# EAGLE board pid2_levitador_esquinas45 (EAGLE 9.7.0)
Placa de controladores PID analógicos con etapa de potencia, una cara (cobre inferior) con puentes de alambre
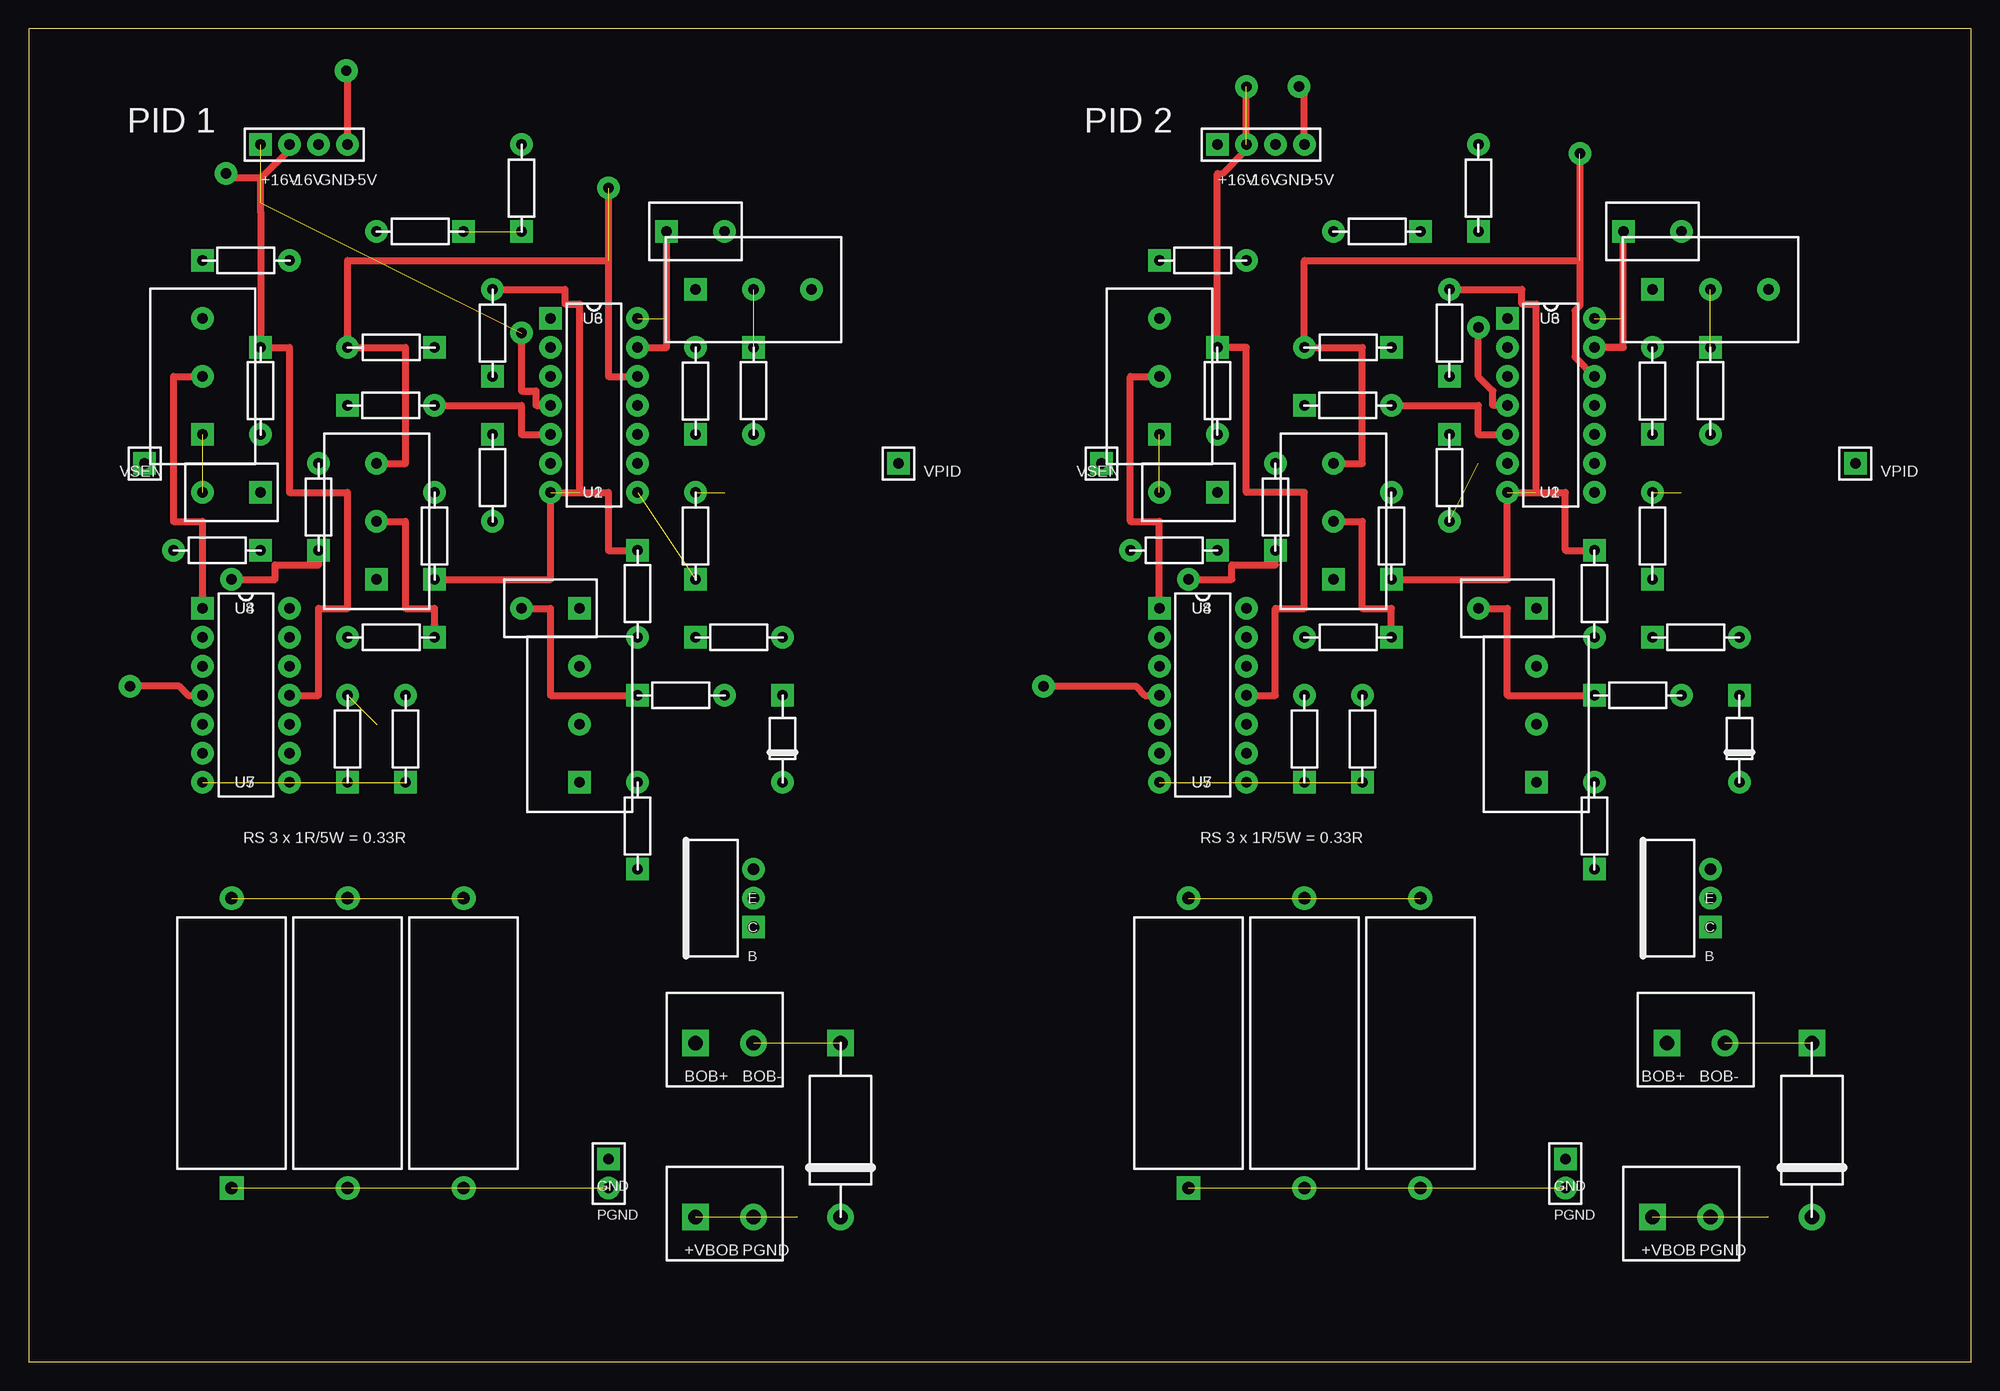
[diagram p0: board, top side]
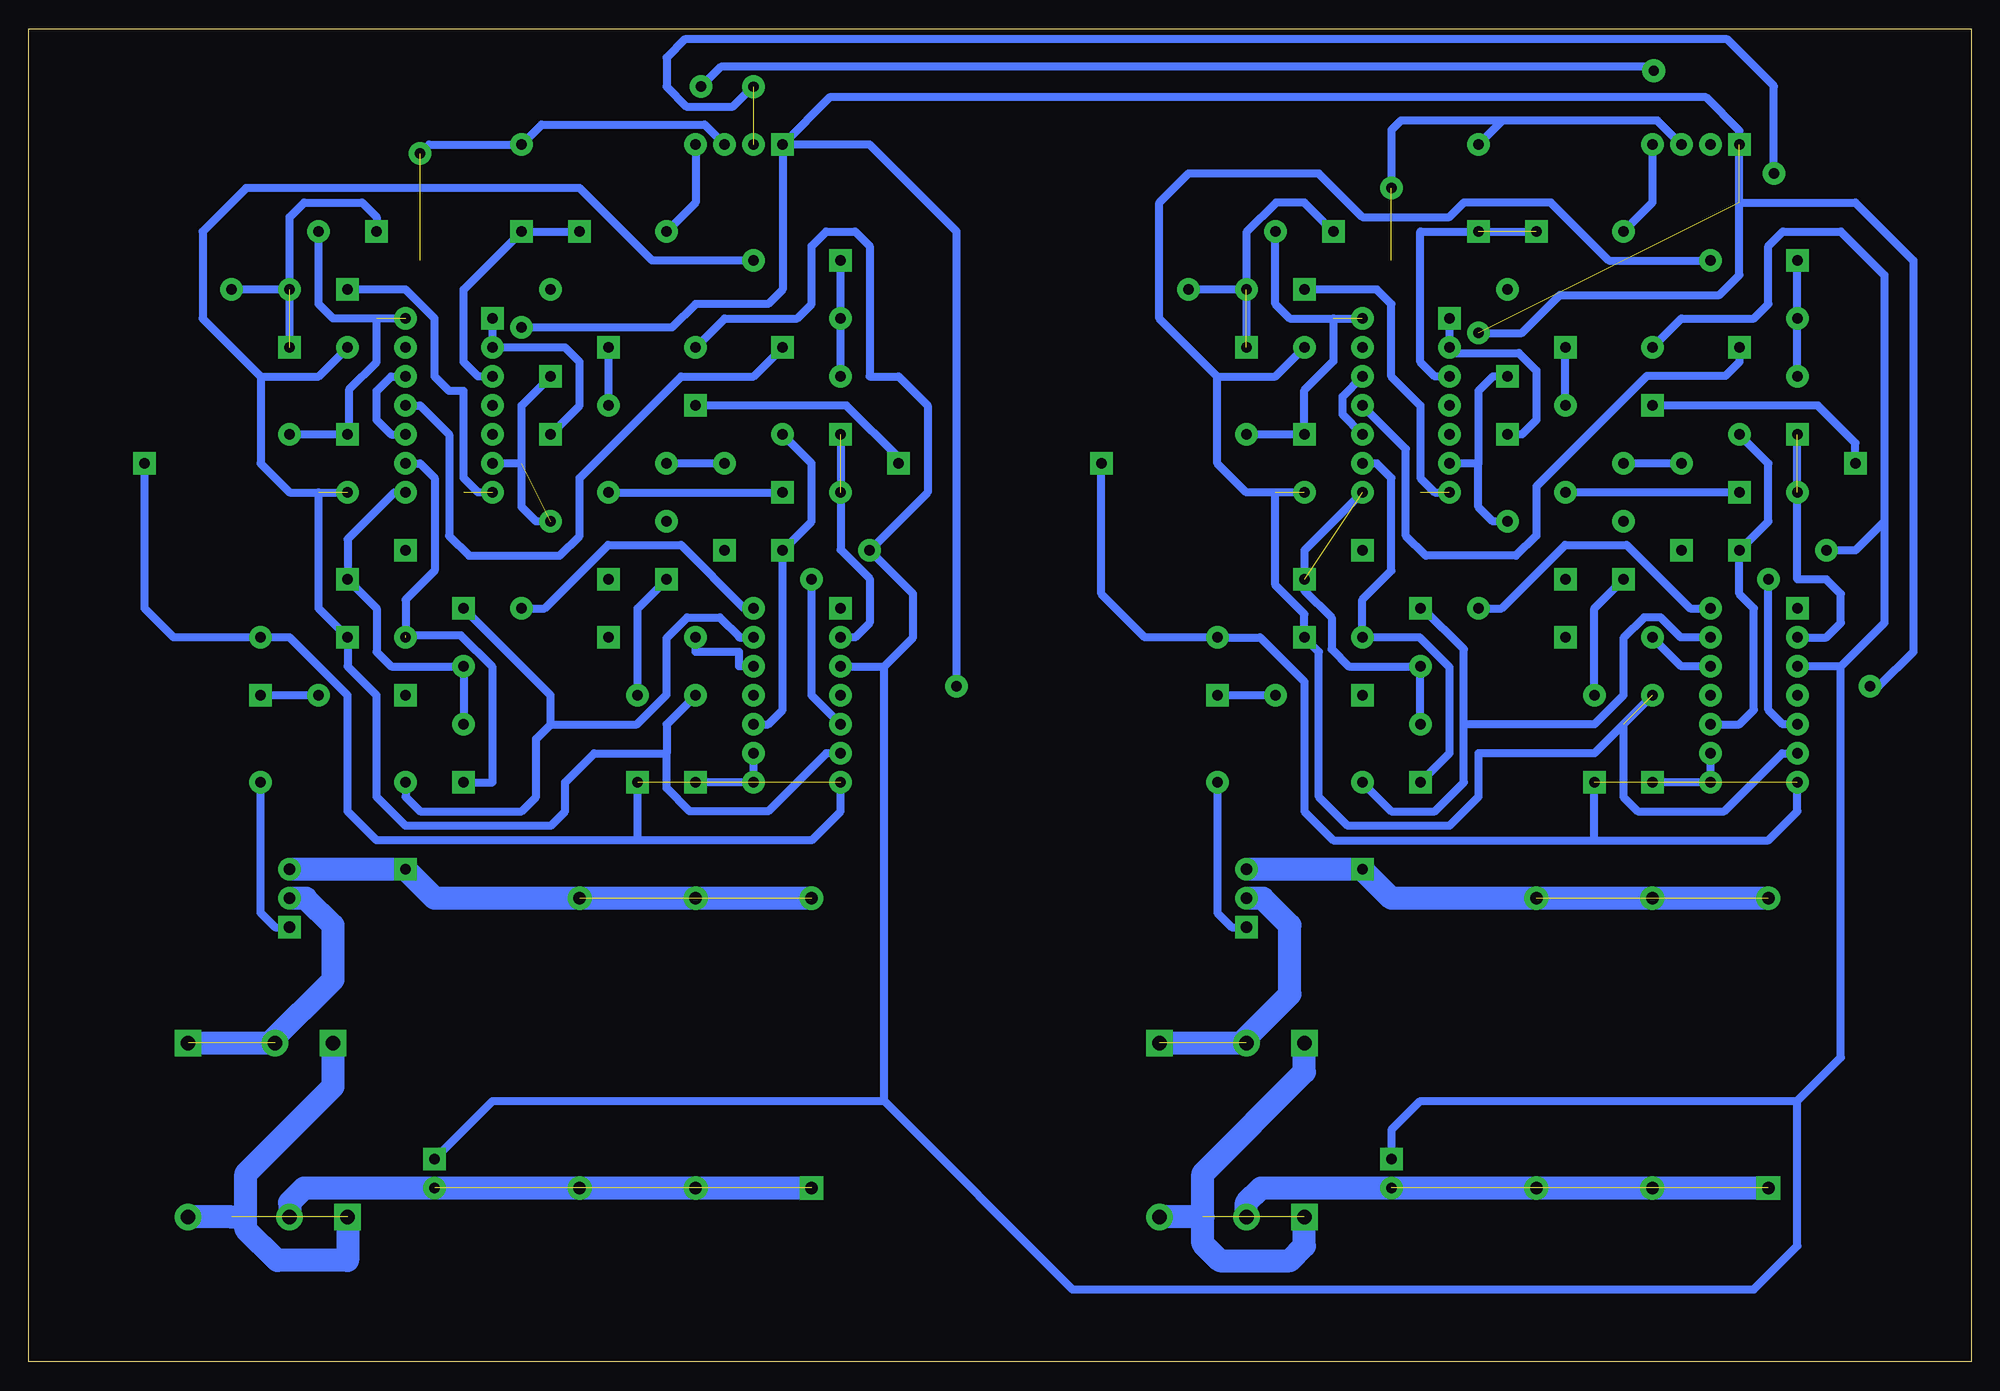
[diagram p1: board, bottom side, seen from below]

Size 170.18 x 116.84 mm. Coordinates in mm from the lower left corner, seen from the top.
Outline: 0,0 170.18,0 170.18,116.84 0,116.84 0,0
Copper layers (1*16): Top / Bottom
Stack-up Default Layer Stack: Top User Defined 0.035mm / Dielectric-1 User Defined 1.5mm / Bottom User Defined 0.035mm
Design rules: minimum copper width class=0 0.7mm, minimum copper width 0.7mm, minimum drill size class=0 0.9mm, minimum drill size 0.9mm, copper clearance wire_polygon to wire_polygon 0.4mm, copper clearance wire_polygon to pad_smd 0.4mm, copper clearance wire_polygon to via 0.4mm, copper clearance pad_smd to pad_smd 0.4mm, copper clearance pad_smd to via 0.4mm, copper clearance via to via 0.4mm, copper clearance smd to pad (same net) 6mil, copper clearance smd to via (same net) 6mil, copper clearance smd to smd (same net) 6mil, dimension clearance 0.6mm, via restrict clearance 0mil, restrict clearance 0mil, drill distance 0.4mm, keepout clearance 0mil
Net classes: 0 default: width 0.7 mm, drill 0.9 mm

## Footprints (pad centres in the part's own frame; a part is rotated, then mirrored left to right if it is on the bottom)
CAP = drill 0.9 pad 2 square: 1 0,0 | drill 0.9 pad 2: 2 5.08,0
DIODE = drill 1.3 pad 2 square: 1 0,0 | drill 1.3 pad 2: 2 15.24,0
DIODE_S = drill 0.9 pad 2 square: 1 0,0 | drill 0.9 pad 2: 2 7.62,0
DIL14 = drill 0.9 pad 2 square: 1 0,0 | drill 0.9 pad 2: 2 0,-2.54; 3 0,-5.08; 4 0,-7.62; 5 0,-10.16; 6 0,-12.7; 7 0,-15.24; 8 7.62,-15.24; 9 7.62,-12.7; 10 7.62,-10.16; 11 7.62,-7.62; 12 7.62,-5.08; 13 7.62,-2.54; 14 7.62,0
TERM2 = drill 1.3 pad 2 square: 1 0,0 | drill 1.3 pad 2: 2 5.08,0
HDR1 = drill 0.9 pad 2 square: 1 0,0
HDR4 = drill 0.9 pad 2 square: 1 0,0 | drill 0.9 pad 2: 2 2.54,0; 3 5.08,0; 4 7.62,0
HDR2 = drill 0.9 pad 2 square: 1 0,0 | drill 0.9 pad 2: 2 2.54,0
POT = drill 0.9 pad 2 square: 1 0,0 | drill 0.9 pad 2: 2 5.08,0; 3 10.16,0
TO220 = drill 1 pad 2 square: 1 0,0 | drill 1 pad 2: 2 2.54,0; 3 5.08,0
RES = drill 0.9 pad 2 square: 1 0,0 | drill 0.9 pad 2: 2 7.62,0
RSBANK = drill 1.1 pad 2 square: 1 0,0 | drill 1.1 pad 2: 2 10.16,0; 3 20.32,0; 4 0,25.4; 5 10.16,25.4; 6 20.32,25.4

## Placement (x,y rotation side)
P1_C1  1u  [CAP]  55.88,99.06 0 top
P1_C2  1u  [CAP]  20.32,76.2 180 top
P1_C3  10n (opc.)  [CAP]  48.26,66.04 180 top
P1_D1  1N5408  [DIODE]  71.12,27.94 270 top
P1_D2  1N4148  [DIODE_S]  66.04,58.42 270 top
P1_IC1  TL074CN  [DIL14]  45.72,91.44 0 top
P1_IC2  TL074CN  [DIL14]  15.24,66.04 0 top
P1_J_COIL  BOBINA  [TERM2]  58.42,27.94 0 top
P1_J_IN  VSENSOR  [HDR1]  10.16,78.74 90 top
P1_J_OUT  VPID  [HDR1]  76.2,78.74 90 top
P1_J_PWR  PWR  [HDR4]  20.32,106.68 0 top
P1_J_VBOB  VBOB  [TERM2]  58.42,12.7 0 top
P1_JP_GND  GND-PGND  [HDR2]  50.8,17.78 270 top
P1_POT1  22k  [POT]  48.26,50.8 90 top
P1_POT2  220k  [POT]  58.42,93.98 0 top
P1_POT3  22k  [POT]  15.24,81.28 90 top
P1_POT4  10k  [POT]  30.48,68.58 90 top
P1_Q1  TIP122  [TO220]  63.5,38.1 90 top
P1_R1  10k  [RES]  40.64,81.28 270 top
P1_R2  10k  [RES]  40.64,86.36 90 top
P1_R3  10k  [RES]  27.94,83.82 0 top
P1_R4  10k  [RES]  35.56,88.9 180 top
P1_R5  10k  [RES]  53.34,71.12 270 top
P1_R6  1k  [RES]  35.56,68.58 90 top
P1_R7  10k  [RES]  58.42,68.58 90 top
P1_R8  10k  [RES]  58.42,81.28 90 top
P1_R9  10k  [RES]  15.24,96.52 0 top
P1_R10  1k  [RES]  58.42,63.5 0 top
P1_R11  1M  [RES]  63.5,88.9 270 top
P1_R12  160k  [RES]  43.18,99.06 90 top
P1_R13  240k  [RES]  38.1,99.06 180 top
P1_R14  96k  [RES]  20.32,88.9 270 top
P1_R15  160k  [RES]  20.32,71.12 180 top
P1_R16  270  [RES]  35.56,63.5 180 top
P1_R17  10k  [RES]  33.02,50.8 90 top
P1_R18  1k  [RES]  53.34,43.18 90 top
P1_RBASE  270  [RES]  53.34,58.42 0 top
P1_RBIAS  4.4k  [RES]  25.4,71.12 90 top
P1_ROFFSET  10k  [RES]  27.94,50.8 90 top
P1_RS  3 x 1R 5W  [RSBANK]  17.78,15.24 0 top
P2_C1  1u  [CAP]  139.7,99.06 0 top
P2_C2  1u  [CAP]  104.14,76.2 180 top
P2_C3  10n (opc.)  [CAP]  132.08,66.04 180 top
P2_D1  1N5408  [DIODE]  156.21,27.94 270 top
P2_D2  1N4148  [DIODE_S]  149.86,58.42 270 top
P2_IC1  TL074CN  [DIL14]  129.54,91.44 0 top
P2_IC2  TL074CN  [DIL14]  99.06,66.04 0 top
P2_J_COIL  BOBINA  [TERM2]  143.51,27.94 0 top
P2_J_IN  VSENSOR  [HDR1]  93.98,78.74 90 top
P2_J_OUT  VPID  [HDR1]  160.02,78.74 90 top
P2_J_PWR  PWR  [HDR4]  104.14,106.68 0 top
P2_J_VBOB  VBOB  [TERM2]  142.24,12.7 0 top
P2_JP_GND  GND-PGND  [HDR2]  134.62,17.78 270 top
P2_POT1  22k  [POT]  132.08,50.8 90 top
P2_POT2  220k  [POT]  142.24,93.98 0 top
P2_POT3  22k  [POT]  99.06,81.28 90 top
P2_POT4  10k  [POT]  114.3,68.58 90 top
P2_Q1  TIP122  [TO220]  147.32,38.1 90 top
P2_R1  10k  [RES]  124.46,81.28 270 top
P2_R2  10k  [RES]  124.46,86.36 90 top
P2_R3  10k  [RES]  111.76,83.82 0 top
P2_R4  10k  [RES]  119.38,88.9 180 top
P2_R5  10k  [RES]  137.16,71.12 270 top
P2_R6  1k  [RES]  119.38,68.58 90 top
P2_R7  10k  [RES]  142.24,68.58 90 top
P2_R8  10k  [RES]  142.24,81.28 90 top
P2_R9  10k  [RES]  99.06,96.52 0 top
P2_R10  1k  [RES]  142.24,63.5 0 top
P2_R11  1M  [RES]  147.32,88.9 270 top
P2_R12  160k  [RES]  127,99.06 90 top
P2_R13  240k  [RES]  121.92,99.06 180 top
P2_R14  96k  [RES]  104.14,88.9 270 top
P2_R15  160k  [RES]  104.14,71.12 180 top
P2_R16  270  [RES]  119.38,63.5 180 top
P2_R17  10k  [RES]  116.84,50.8 90 top
P2_R18  1k  [RES]  137.16,43.18 90 top
P2_RBASE  270  [RES]  137.16,58.42 0 top
P2_RBIAS  4.4k  [RES]  109.22,71.12 90 top
P2_ROFFSET  10k  [RES]  111.76,50.8 90 top
P2_RS  3 x 1R 5W  [RSBANK]  101.6,15.24 0 top

## Library data of the parts
P1_C1-P1_C3 P1_D1 P1_D2 P1_IC1 P1_IC2 P1_J_COIL P1_J_IN P1_J_OUT P1_J_PWR P1_J_VBOB P1_JP_GND P1_POT1-P1_POT4 P1_Q1 P1_R1-P1_R18 P1_RBASE P1_RBIAS P1_ROFFSET P1_RS P2_C1-P2_C3 P2_D1 P2_D2 P2_IC1 P2_IC2 P2_J_COIL P2_J_IN P2_J_OUT P2_J_PWR P2_J_VBOB P2_JP_GND P2_POT1-P2_POT4 P2_Q1 P2_R1-P2_R18 P2_RBASE P2_RBIAS P2_ROFFSET P2_RS = pid4

## Nets
+5V: P1_J_PWR.4 P1_R13.2 P2_J_PWR.4 P2_R13.2
+16V: P1_IC1.4 P1_IC2.4 P1_J_PWR.1 P2_IC1.4 P2_IC2.4 P2_J_PWR.1
-16V: P1_IC1.11 P1_IC2.11 P1_J_PWR.2 P1_R14.1 P2_IC1.11 P2_IC2.11 P2_J_PWR.2 P2_R14.1
GND: P1_IC1.10 P1_IC1.12 P1_IC2.3 P1_J_PWR.3 P1_JP_GND.1 P1_POT4.3 P1_R4.2 P1_R12.2 P1_R15.2 P1_RBIAS.2 P2_IC1.10 P2_IC1.12 P2_IC2.3 P2_J_PWR.3 P2_JP_GND.1 P2_POT4.3 P2_R4.2 P2_R12.2 P2_R15.2 P2_RBIAS.2
P1_+VBOB: P1_D1.2 P1_J_COIL.1 P1_J_VBOB.1
P1_BASE: P1_D2.2 P1_Q1.1
P1_BASEA: P1_D2.1 P1_RBASE.2
P1_COILN: P1_D1.1 P1_J_COIL.2 P1_Q1.2
P1_INMU: P1_C3.1 P1_IC2.13 P1_R18.2
P1_IOUT: P1_C3.2 P1_IC2.14 P1_RBASE.1
P1_ISENSE: P1_Q1.3 P1_R18.1 P1_RS.4 P1_RS.5 P1_RS.6
P1_PGND: P1_J_VBOB.2 P1_JP_GND.2 P1_RS.1 P1_RS.2 P1_RS.3
P1_R6C2: P1_C2.1 P1_R6.2
P1_SUMN: P1_IC2.6 P1_R7.2 P1_R8.2 P1_R9.2 P1_R10.1 P1_ROFFSET.2
P1_U1N: P1_IC1.6 P1_R1.2 P1_R2.1
P1_U1P: P1_IC1.5 P1_R3.2 P1_R4.1
P1_U2N: P1_IC1.9 P1_POT1.1 P1_R5.2
P1_U3N: P1_C1.1 P1_IC1.13 P1_POT2.2 P1_POT2.3 P1_R11.1
P1_U4N: P1_C2.2 P1_IC2.2 P1_POT3.1
P1_U5P: P1_IC2.5 P1_RBIAS.1
P1_VCAL: P1_POT4.2 P1_R16.1
P1_VD: P1_IC2.1 P1_POT3.2 P1_POT3.3 P1_R9.1
P1_VDIV: P1_POT4.1 P1_R17.2
P1_VE: P1_IC1.7 P1_POT2.1 P1_R2.2 P1_R5.1 P1_R6.1
P1_VI: P1_C1.2 P1_IC1.14 P1_R8.1 P1_R11.2
P1_VINP: P1_IC2.12 P1_R16.2
P1_VOFF: P1_IC2.8 P1_IC2.9 P1_ROFFSET.1
P1_VOFFD: P1_IC2.10 P1_R14.2 P1_R15.1
P1_VP: P1_IC1.8 P1_POT1.2 P1_POT1.3 P1_R7.1
P1_VPID: P1_IC2.7 P1_J_OUT.1 P1_R10.2 P1_R17.1
P1_VREF: P1_IC1.1 P1_IC1.2 P1_R1.1
P1_VREFD: P1_IC1.3 P1_R12.1 P1_R13.1
P1_VSEN: P1_J_IN.1 P1_R3.1
P2_+VBOB: P2_D1.2 P2_J_COIL.1 P2_J_VBOB.1
P2_BASE: P2_D2.2 P2_Q1.1
P2_BASEA: P2_D2.1 P2_RBASE.2
P2_COILN: P2_D1.1 P2_J_COIL.2 P2_Q1.2
P2_INMU: P2_C3.1 P2_IC2.13 P2_R18.2
P2_IOUT: P2_C3.2 P2_IC2.14 P2_RBASE.1
P2_ISENSE: P2_Q1.3 P2_R18.1 P2_RS.4 P2_RS.5 P2_RS.6
P2_PGND: P2_J_VBOB.2 P2_JP_GND.2 P2_RS.1 P2_RS.2 P2_RS.3
P2_R6C2: P2_C2.1 P2_R6.2
P2_SUMN: P2_IC2.6 P2_R7.2 P2_R8.2 P2_R9.2 P2_R10.1 P2_ROFFSET.2
P2_U1N: P2_IC1.6 P2_R1.2 P2_R2.1
P2_U1P: P2_IC1.5 P2_R3.2 P2_R4.1
P2_U2N: P2_IC1.9 P2_POT1.1 P2_R5.2
P2_U3N: P2_C1.1 P2_IC1.13 P2_POT2.2 P2_POT2.3 P2_R11.1
P2_U4N: P2_C2.2 P2_IC2.2 P2_POT3.1
P2_U5P: P2_IC2.5 P2_RBIAS.1
P2_VCAL: P2_POT4.2 P2_R16.1
P2_VD: P2_IC2.1 P2_POT3.2 P2_POT3.3 P2_R9.1
P2_VDIV: P2_POT4.1 P2_R17.2
P2_VE: P2_IC1.7 P2_POT2.1 P2_R2.2 P2_R5.1 P2_R6.1
P2_VI: P2_C1.2 P2_IC1.14 P2_R8.1 P2_R11.2
P2_VINP: P2_IC2.12 P2_R16.2
P2_VOFF: P2_IC2.8 P2_IC2.9 P2_ROFFSET.1
P2_VOFFD: P2_IC2.10 P2_R14.2 P2_R15.1
P2_VP: P2_IC1.8 P2_POT1.2 P2_POT1.3 P2_R7.1
P2_VPID: P2_IC2.7 P2_J_OUT.1 P2_R10.2 P2_R17.1
P2_VREF: P2_IC1.1 P2_IC1.2 P2_R1.1
P2_VREFD: P2_IC1.3 P2_R12.1 P2_R13.1
P2_VSEN: P2_J_IN.1 P2_R3.1

## Tracks (layer width: path | path; a pad name or v marks a point on that pad's centre or on a via)
+5V  (via drill 0.9 pad 2)
  Top 0.6: P1_J_PWR.4 27.94,113.03 v27.83,113.14 | P2_J_PWR.4 111.76,111.28 v111.28,111.76
  Bottom 0.7: P1_J_PWR.4 27.94,101.6 P1_R13.2 | P2_J_PWR.4 111.76,101.6 P2_R13.2 | v27.83,113.14 27.83,113.49 109.55,113.49 v111.28,111.76
+16V  (via drill 0.9 pad 2)  (2 unrouted)
  Top 0.6: P1_IC2.4 13.97,58.42 13.18,59.21 v8.89,59.21 | P2_IC2.4 97.79,58.42 97,59.21 v88.9,59.21 | P1_IC1.4 44.45,83.82 44.45,85.09 43.18,85.09 v43.18,90.17 | P2_IC1.4 128.27,83.82 128.27,85.09 127,86.36 v127,90.65
  Bottom 0.7: 20.32,101.6 10.16,101.6 5.08,96.52 5.08,62.23 8.1,59.21 v8.89,59.21 | v127,90.65 113.82,90.65 111.76,92.71 105.41,92.71 104.14,93.98 P2_J_PWR.1 | P2_J_PWR.1 100.02,110.8 23.23,110.8 20.32,107.89 20.32,95.25 22.07,93.5 36.04,93.5 39.37,90.17 v43.18,90.17 | v88.9,59.21 88.9,99.06 96.52,106.68 P2_J_PWR.1
-16V  (via drill 0.9 pad 2)  (1 unrouted)
  Top 0.6: P1_IC2.11 25.4,58.42 25.4,66.04 27.94,66.04 27.94,76.2 22.86,76.2 22.86,88.9 P1_R14.1 20.32,100.74 20.32,103.71 20.34,103.71 | P2_IC2.11 109.22,58.42 109.22,66.04 111.76,66.04 111.76,76.2 106.68,76.2 106.68,88.9 P2_R14.1 104.14,104.14 104.59,104.14 106.68,106.23 v106.68,111.74 | P1_J_PWR.2 22.86,106.23 20.34,103.71 | 20.34,103.71 17.73,103.71 v17.3,104.14
  Bottom 0.7: P1_R14.1 20.32,87.63 21.56,86.39 28.43,86.39 38.1,76.72 38.1,72.39 38.16,72.39 39.91,70.64 47.78,70.64 49.53,72.39 49.53,80.01 P1_IC1.11 | P2_IC1.11 135.89,83.82 133.35,81.28 133.35,72.39 131.6,70.64 123.67,70.64 121.92,72.39 121.92,77.47 113.03,86.36 106.68,86.36 P2_R14.1 | v17.3,104.14 17.3,111.76 17.28,111.78 21.39,115.89 112.71,115.89 114.3,114.3 114.3,111.76 112.55,110.01 108.5,110.01 106.76,111.74 v106.68,111.74
GND  (via drill 0.9 pad 2)  (2 unrouted)
  Top 0.6: P1_POT4.3 33.02,78.74 33.02,88.9 P1_R4.2 27.94,96.52 50.8,96.52 | P2_POT4.3 116.84,78.74 116.84,88.9 P2_R4.2 111.76,96.52 135.89,96.52 | P1_IC1.12 50.8,86.36 v50.8,102.87 | v135.89,105.89 135.89,92.57 135.46,92.14 135.46,88.06 P2_IC1.12
  Bottom 0.7: P2_JP_GND.1 129.54,22.86 95.25,22.86 | 95.25,22.86 78.74,6.35 19.05,6.35 15.24,10.16 15.24,22.86 | P1_JP_GND.1 50.8,20.32 48.26,22.86 15.24,22.86 | 15.24,22.86 11.43,26.67 11.43,60.96 | 7.62,73.66 7.62,64.77 11.43,60.96 | 11.43,60.96 P1_IC2.3 | P2_IC2.3 95.25,60.96 | 95.25,60.96 92.71,63.5 92.71,67.31 P2_R15.2 91.44,76.2 91.44,83.82 93.98,86.36 96.52,86.36 96.52,97.79 97.79,99.06 100.33,99.06 101.6,97.79 101.6,92.71 102.87,91.44 109.22,91.44 P2_R4.2 | 7.62,73.66 7.62,95.25 11.43,99.06 16.51,99.06 17.78,97.79 17.78,92.71 19.05,91.44 25.4,91.44 P1_R4.2 | 7.62,73.66 10.16,71.12 P1_R15.2 | P1_RBIAS.2 P1_POT4.3 | P2_RBIAS.2 P2_POT4.3 | 95.25,22.86 95.25,60.96 | P1_J_PWR.3 27.5,108.78 41.08,108.78 | 41.08,108.78 49.97,108.78 50.8,107.95 v50.8,102.87 | P1_R12.2 41.08,108.78 | P1_IC1.12 55.09,84.61 55.09,83.03 P1_IC1.10 | P2_J_PWR.3 110.97,108.43 125.25,108.43 P2_R12.2 135.1,106.68 v135.89,105.89 | P2_IC1.12 138.43,86.36 139.7,85.09 139.7,82.55 138.43,81.28 P2_IC1.10
P1_+VBOB  (1 unrouted)
  Bottom 2: 67.31,12.7 P1_D1.2 | P1_J_COIL.1 58.42,25.4 67.32,16.5 67.32,10.37 65.83,8.88 59.7,8.88 58.42,10.16 P1_J_VBOB.1
P1_BASE
  Bottom 0.7: P1_Q1.1 64.77,38.1 66.04,39.37 P1_D2.2
P1_BASEA
  Bottom 0.7: P1_RBASE.2 P1_D2.1
P1_COILN  (1 unrouted)
  Bottom 2: P1_D1.1 63.97,27.94 59.69,32.22 59.69,38.27 62.06,40.64 P1_Q1.2
P1_INMU
  Bottom 0.7: 44.45,55.88 44.45,50.8 46.99,48.26 50.8,48.26 P1_R18.2 | 44.45,55.88 33.02,55.88 30.48,58.42 30.48,63.44 28.66,65.25 27.21,65.25 25.46,63.5 P1_IC2.13 | 44.45,55.88 44.45,62.45 48.04,66.04 P1_C3.1
P1_IOUT
  Top 0.6: P1_RBASE.1 45.72,58.42 45.72,66.04 P1_C3.2
  Bottom 0.7: P1_C3.2 41.16,66.04 35.6,71.6 30.21,71.6 24.65,66.04 P1_IC2.14
P1_ISENSE  (2 unrouted)
  Bottom 2: P1_RS.4 50.8,40.64 P1_R18.1 P1_Q1.3
P1_PGND  (3 unrouted)
  Bottom 2: P1_J_VBOB.2 63.5,13.97 62.22,15.25 P1_RS.1
P1_R6C2
  Bottom 0.7: P1_C2.1 P1_R6.2
P1_SUMN  (2 unrouted)
  Bottom 0.7: 30.48,55.88 30.48,49.53 29.21,48.26 21.66,48.26 16.57,53.34 P1_IC2.6 | P1_ROFFSET.2 33.02,53.34 43.18,53.34 43.18,49.53 45.72,46.99 54.61,46.99 57.15,49.53 57.15,62.23 P1_R10.1 58.42,65.52 60.96,68.06 60.96,76.2 | P1_R7.2 63.5,76.2 66.04,78.74 66.04,86.36 | 66.04,86.36 60.96,86.36 P1_R8.2 | 66.04,86.36 71.12,91.44 71.12,101.6 68.58,104.14 57.15,104.14 53.34,100.33 45.72,100.33 44.45,101.6 36.83,101.6 31.75,96.52 P1_R9.2
P1_U1N
  Bottom 0.7: P1_R1.2 41.91,73.66 43.18,74.93 43.18,78.74 | 43.18,78.74 P1_IC1.6 | P1_R2.1 41.91,86.36 43.18,85.09 43.18,78.74
P1_U1P
  Top 0.6: P1_IC1.5 43.18,81.28 43.18,83.82 P1_R3.2
  Bottom 0.7: P1_R3.2 P1_R4.1
P1_U2N
  Bottom 0.7: P1_POT1.1 45.72,53.34 45.72,60.9 48.33,63.5 P1_R5.2 53.34,66.79 50.8,69.33 50.8,77.47 52.07,78.74 P1_IC1.9
P1_U3N  (1 unrouted)
  Top 0.6: P1_IC1.13 55.88,88.9 P1_C1.1
  Bottom 0.7: P1_POT2.2 P1_POT2.3 | P1_R11.1 63.5,99 60.9,101.6 58.42,101.6 P1_C1.1
P1_U4N  (1 unrouted)
  Bottom 0.7: P1_IC2.2 12.7,63.5 11.43,64.77 11.43,67.31 12.7,68.58 15.24,68.58 P1_POT3.1
P1_U5P  (via drill 0.9 pad 2)
  Top 0.6: v17.78,68.58 21.59,68.58 21.59,69.85 25.4,69.85 P1_RBIAS.1
  Bottom 0.7: P1_IC2.5 16.51,55.88 17.78,57.15 v17.78,68.58
P1_VCAL
  Top 0.6: P1_POT4.2 33.02,73.66 33.02,66.04 35.56,66.04 P1_R16.1
P1_VD
  Top 0.6: P1_POT3.2 12.7,86.36 12.7,73.66 15.24,73.66 P1_IC2.1
  Bottom 0.7: P1_POT3.2 P1_R9.1
P1_VDIV
  Bottom 0.7: P1_POT4.1 33.02,66.04 P1_R17.2
P1_VE  (1 unrouted)
  Top 0.6: P1_R6.1 45.72,68.58 P1_IC1.7 50.8,76.2 50.8,71.12 P1_R5.1 | P1_R2.2 46.99,93.98 46.99,92.71 48.26,92.71 48.26,76.2
  Bottom 0.7: P1_IC1.7 46.99,76.2 48.26,77.47 48.26,83.82 50.8,86.36 50.8,92.71 52.07,93.98 P1_POT2.1
P1_VI  (1 unrouted)
  Bottom 0.7: P1_R11.2 P1_R8.1 58.42,85.16 55.88,87.69 55.88,91.44 | P1_IC1.14 59.69,91.44 60.96,92.71 P1_C1.2
P1_VINP
  Bottom 0.7: P1_IC2.12 25.4,60.96 P1_R16.2
P1_VOFF
  Bottom 0.7: P1_ROFFSET.1 P1_IC2.8 P1_IC2.9
P1_VOFFD
  Bottom 0.7: P1_IC2.10 20.32,55.88 19.05,57.15 19.05,66.04 20.32,67.31 P1_R15.1 17.78,73.66 17.78,78.74 P1_R14.2
P1_VP  (1 unrouted)
  Bottom 0.7: P1_POT1.2 P1_POT1.3 54.55,60.96 56.05,62.47 56.05,65.23 58.42,67.6 58.42,71.12 P1_IC1.8
P1_VPID  (1 unrouted)
  Bottom 0.7: P1_IC2.7 15.24,48.26 17.78,45.72 55.88,45.72 58.42,48.26 58.42,59.62 62.3,63.5 P1_R10.2 72.39,63.5 76.2,67.31 P1_J_OUT.1 | 33.02,45.72 P1_R17.1
P1_VREF
  Bottom 0.7: P1_R1.1 39.37,81.28 38.1,82.55 38.1,86.88 39.64,88.42 45.24,88.42 P1_IC1.2 P1_IC1.1
P1_VREFD  (1 unrouted)
  Bottom 0.7: P1_IC1.3 46.99,86.36 48.26,87.63 48.26,99.06 P1_R13.1
P1_VSEN
  Bottom 0.7: P1_J_IN.1 10.16,80.53 13.45,83.82 P1_R3.1
P2_+VBOB  (1 unrouted)
  Bottom 2: 152.4,12.7 P2_D1.2 | P2_J_VBOB.1 142.24,8.89 148.39,8.89 151.14,11.64 151.14,16.5 143.51,24.13 P2_J_COIL.1
P2_BASE
  Bottom 0.7: P2_Q1.1 148.59,38.1 149.86,39.37 P2_D2.2
P2_BASEA
  Bottom 0.7: P2_RBASE.2 P2_D2.1
P2_COILN  (1 unrouted)
  Bottom 2: P2_D1.1 149.06,27.94 143.51,33.49 143.51,38.27 145.88,40.64 P2_Q1.2
P2_INMU
  Bottom 0.7: P2_R18.2 137.16,49.53 135.89,48.26 127,48.26 125.73,49.53 125.73,54.61 124.46,55.88 | P2_IC2.13 107.95,63.5 107.95,63.56 109.64,65.25 112.48,65.25 114.3,63.44 114.3,58.48 116.91,55.88 124.46,55.88 | 124.46,55.88 124.46,58.42 129.54,63.5 P2_C3.1
P2_IOUT
  Top 0.6: P2_RBASE.1 129.54,58.42 129.54,66.04 P2_C3.2
  Bottom 0.7: P2_IC2.14 107.47,66.04 113.03,71.6 119.42,71.6 124.98,66.04 P2_C3.2
P2_ISENSE  (2 unrouted)
  Bottom 2: P2_RS.4 134.62,40.64 P2_R18.1 P2_Q1.3
P2_PGND  (3 unrouted)
  Bottom 2: P2_J_VBOB.2 147.32,13.97 146.04,15.25 P2_RS.1
P2_R6C2
  Bottom 0.7: P2_R6.2 P2_C2.1
P2_SUMN  (1 unrouted)
  Bottom 0.7: 114.3,53.34 120.65,53.34 123.19,50.8 123.19,48.26 124.46,46.99 137.16,46.99 139.7,49.53 139.7,58.42 142.24,60.96 P2_R10.1 144.78,66.04 144.78,76.2 | P2_IC2.6 100.33,53.34 105.41,48.26 112.28,48.26 114.3,50.28 114.3,53.34 | 149.86,86.36 149.86,78.74 147.32,76.2 P2_R7.2 | 149.86,86.36 144.78,86.36 P2_R8.2 | 149.86,86.36 154.94,91.44 154.94,99.06 151.13,102.87 121.92,102.87 115.57,96.52 P2_R9.2 | P2_ROFFSET.2 114.3,55.88 114.3,53.34
P2_U1N  (1 unrouted)
  Bottom 0.7: P2_R1.2 125.73,73.66 127,74.93 127,83.82 P2_R2.1 | 127,78.74 P2_IC1.6
P2_U1P
  Top 0.6: P2_IC1.5 127,81.28 127,83.82 P2_R3.2
  Bottom 0.7: P2_R3.2 P2_R4.1
P2_U2N  (1 unrouted)
  Bottom 0.7: P2_POT1.1 129.54,50.8 129.54,60.9 132.31,63.67 137.16,63.67 | P2_IC1.9 135.89,78.74 134.62,77.47 134.62,69.33 137.16,66.79 P2_R5.2
P2_U3N  (1 unrouted)
  Top 0.6: P2_IC1.13 139.7,88.9 P2_C1.1
  Bottom 0.7: P2_POT2.2 P2_POT2.3 | P2_C1.1 139.7,100.33 140.97,101.6 146.05,101.6 147.32,100.33 P2_R11.1
P2_U4N  (1 unrouted)
  Bottom 0.7: P2_IC2.2 97.79,63.5 96.52,64.77 96.52,68.64 99.06,71.19 P2_POT3.1
P2_U5P  (via drill 0.9 pad 2)
  Top 0.6: v101.6,68.58 105.41,68.58 105.41,69.85 109.22,69.85 P2_RBIAS.1
  Bottom 0.7: v101.6,68.58 101.6,58.42 P2_IC2.5
P2_VCAL
  Top 0.6: P2_POT4.2 116.84,73.66 116.84,66.04 119.38,66.04 P2_R16.1
P2_VD
  Top 0.6: P2_POT3.2 96.52,86.36 96.52,73.66 99.06,73.66 P2_IC2.1
  Bottom 0.7: P2_POT3.2 P2_R9.1
P2_VDIV
  Bottom 0.7: P2_R17.2 116.84,66.04 P2_POT4.1
P2_VE  (1 unrouted)
  Top 0.6: P2_R6.1 129.54,68.58 P2_IC1.7 134.62,76.2 134.62,71.12 P2_R5.1 | P2_R2.2 130.81,93.98 130.81,92.71 132.08,92.71 132.08,76.2
  Bottom 0.7: P2_IC1.7 130.81,76.2 132.08,77.47 132.08,85.09 133.35,85.09 134.62,86.36 134.62,91.44 137.16,93.98 P2_POT2.1
P2_VI  (1 unrouted)
  Bottom 0.7: P2_R11.2 P2_R8.1 142.07,81.45 142.07,85.26 139.7,87.63 139.7,91.44 | P2_IC1.14 143.51,91.44 144.78,92.71 P2_C1.2
P2_VINP
  Bottom 0.7: P2_IC2.12 107.95,60.96 107.95,62.23 111.76,62.23 P2_R16.2
P2_VOFF
  Bottom 0.7: P2_ROFFSET.1 P2_IC2.8 P2_IC2.9
P2_VOFFD
  Bottom 0.7: P2_R14.2 101.6,78.74 101.6,73.66 P2_R15.1 104.14,57.15 105.41,55.88 P2_IC2.10
P2_VP
  Bottom 0.7: P2_POT1.2 P2_POT1.3 138.43,60.96 139.7,62.23 139.7,66.04 P2_R7.1 142.24,72.1 138.14,76.2 P2_IC1.8
P2_VPID  (1 unrouted)
  Bottom 0.7: P2_IC2.7 99.06,48.26 101.6,45.72 139.7,45.72 142.24,48.26 142.24,58.42 147.32,63.5 P2_R10.2 157.48,63.5 160.02,66.04 P2_J_OUT.1 | 116.84,45.72 P2_R17.1
P2_VREF
  Bottom 0.7: P2_R1.1 121.92,83.82 121.92,87.63 123.19,88.9 P2_IC1.2 P2_IC1.1
P2_VREFD
  Bottom 0.7: P2_IC1.3 130.81,86.36 132.08,87.63 132.08,93.98 P2_R12.1 P2_R13.1
P2_VSEN
  Bottom 0.7: P2_J_IN.1 93.98,79.26 98.54,83.82 P2_R3.1

## Text on the board
tPlace: PID 1 | PID 2 | +16V | -16V | GND | +5V | +16V | -16V | GND | +5V | U3 | U6 | U3 | U6 | VSEN | VPID | VSEN | VPID | U1 | U2 | U1 | U2 | U4 | U8 | U4 | U8 | U5 | U7 | U5 | U7 | RS 3 x 1R/5W = 0.33R | RS 3 x 1R/5W = 0.33R | E | E | C | C | B | B | BOB+ | BOB- | BOB+ | BOB- | GND | GND | PGND | PGND | +VBOB | PGND | +VBOB | PGND